# Altium PCB DIO_8SMA_8MCX_MEZZ.PcbDoc (part 1 of 4)
Units mm, origin at the board's own origin, x right, y up, seen from the top; angles counter-clockwise.
Board outline 143 x 98.9 mm, 4 copper layers (Top Layer, Layer 1, Layer 2, Bottom Layer), stack 1.57 mm thick; 303 components, 168 nets, 944 pads, 487 vias.
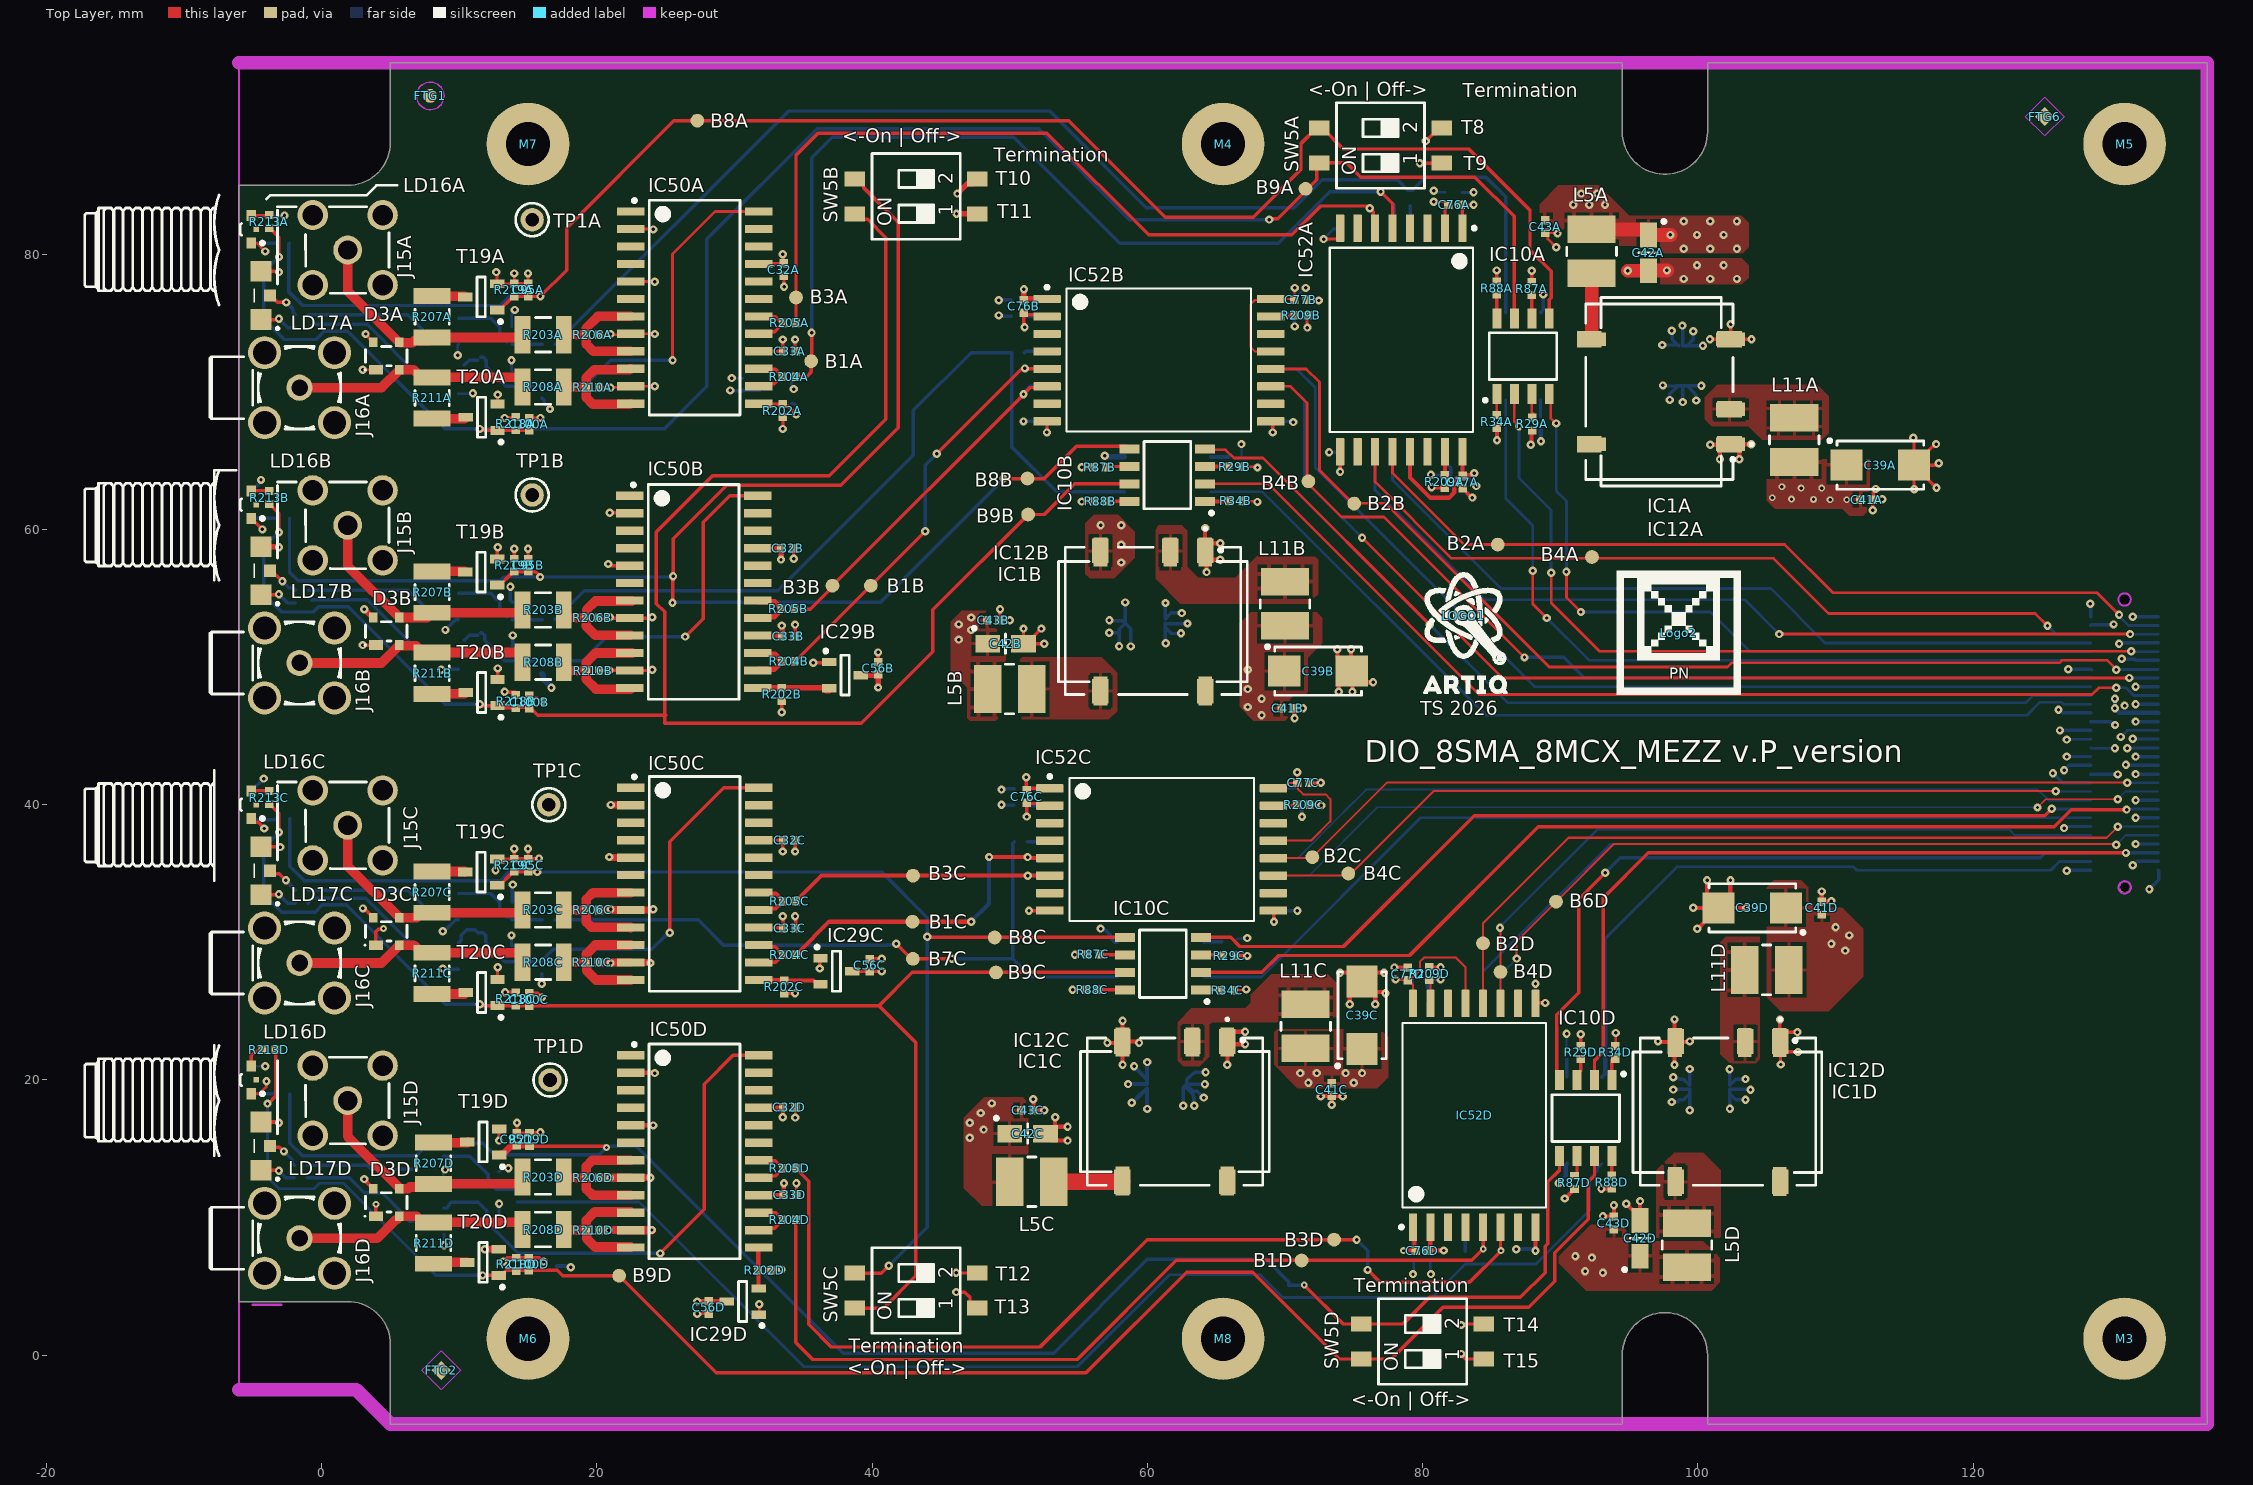
[diagram p0: Top Layer view]
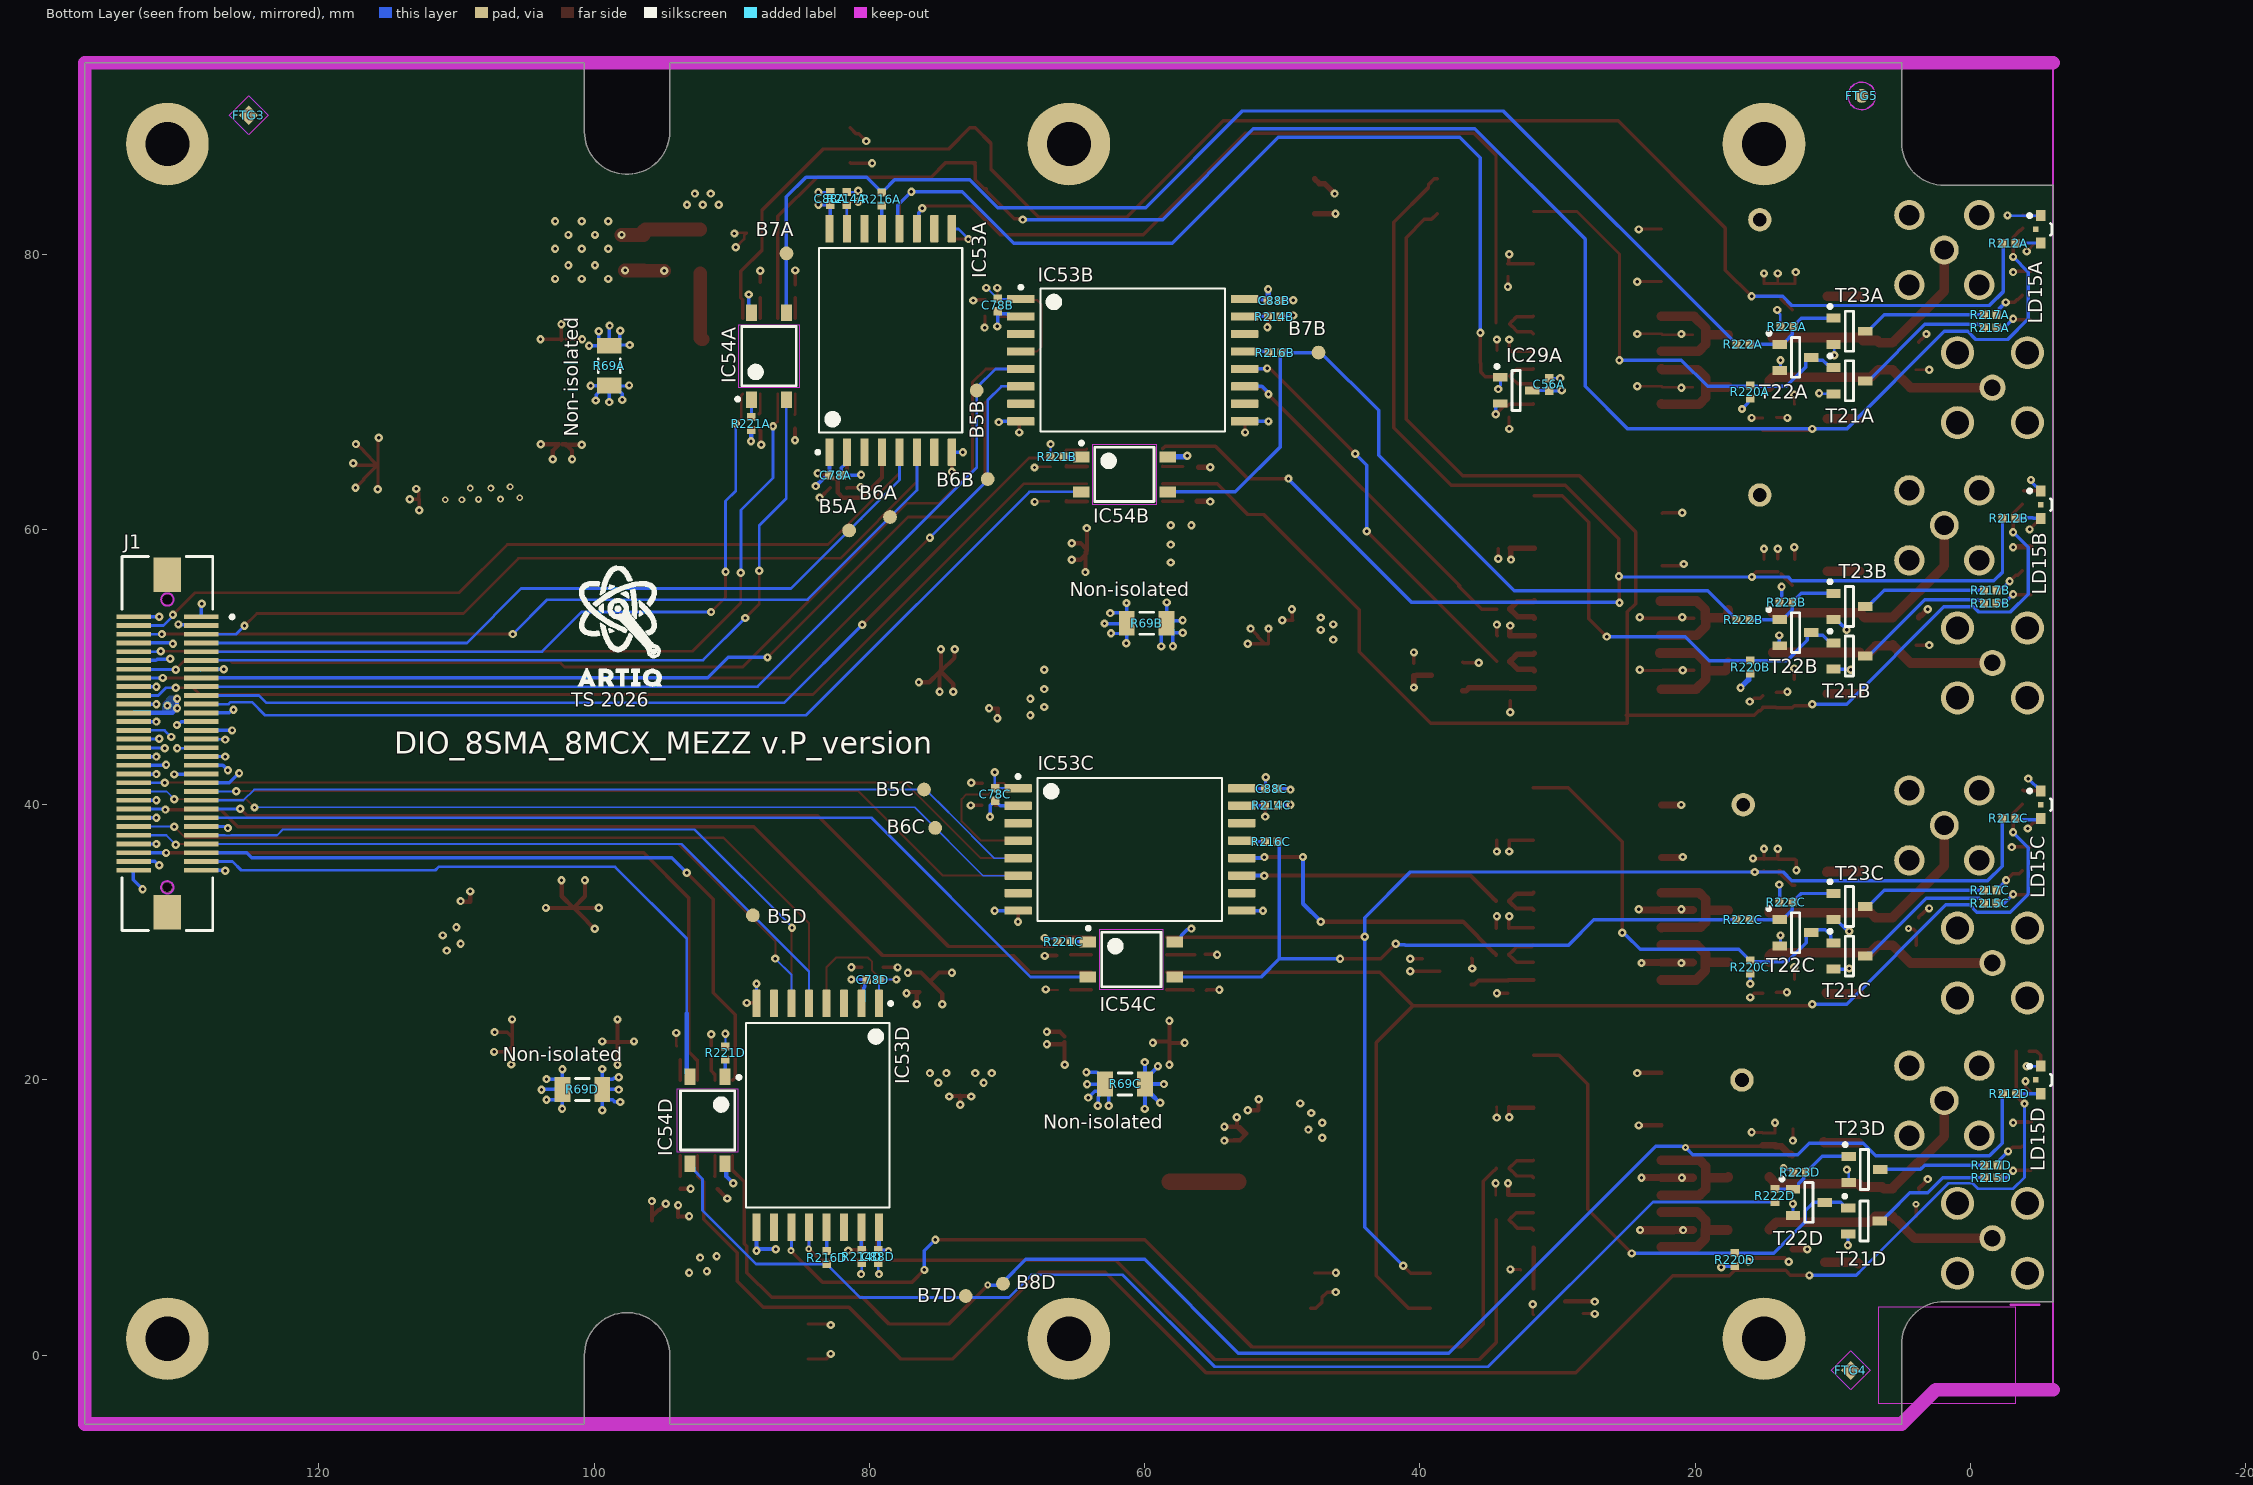
[diagram p1: Bottom Layer view, seen from below]
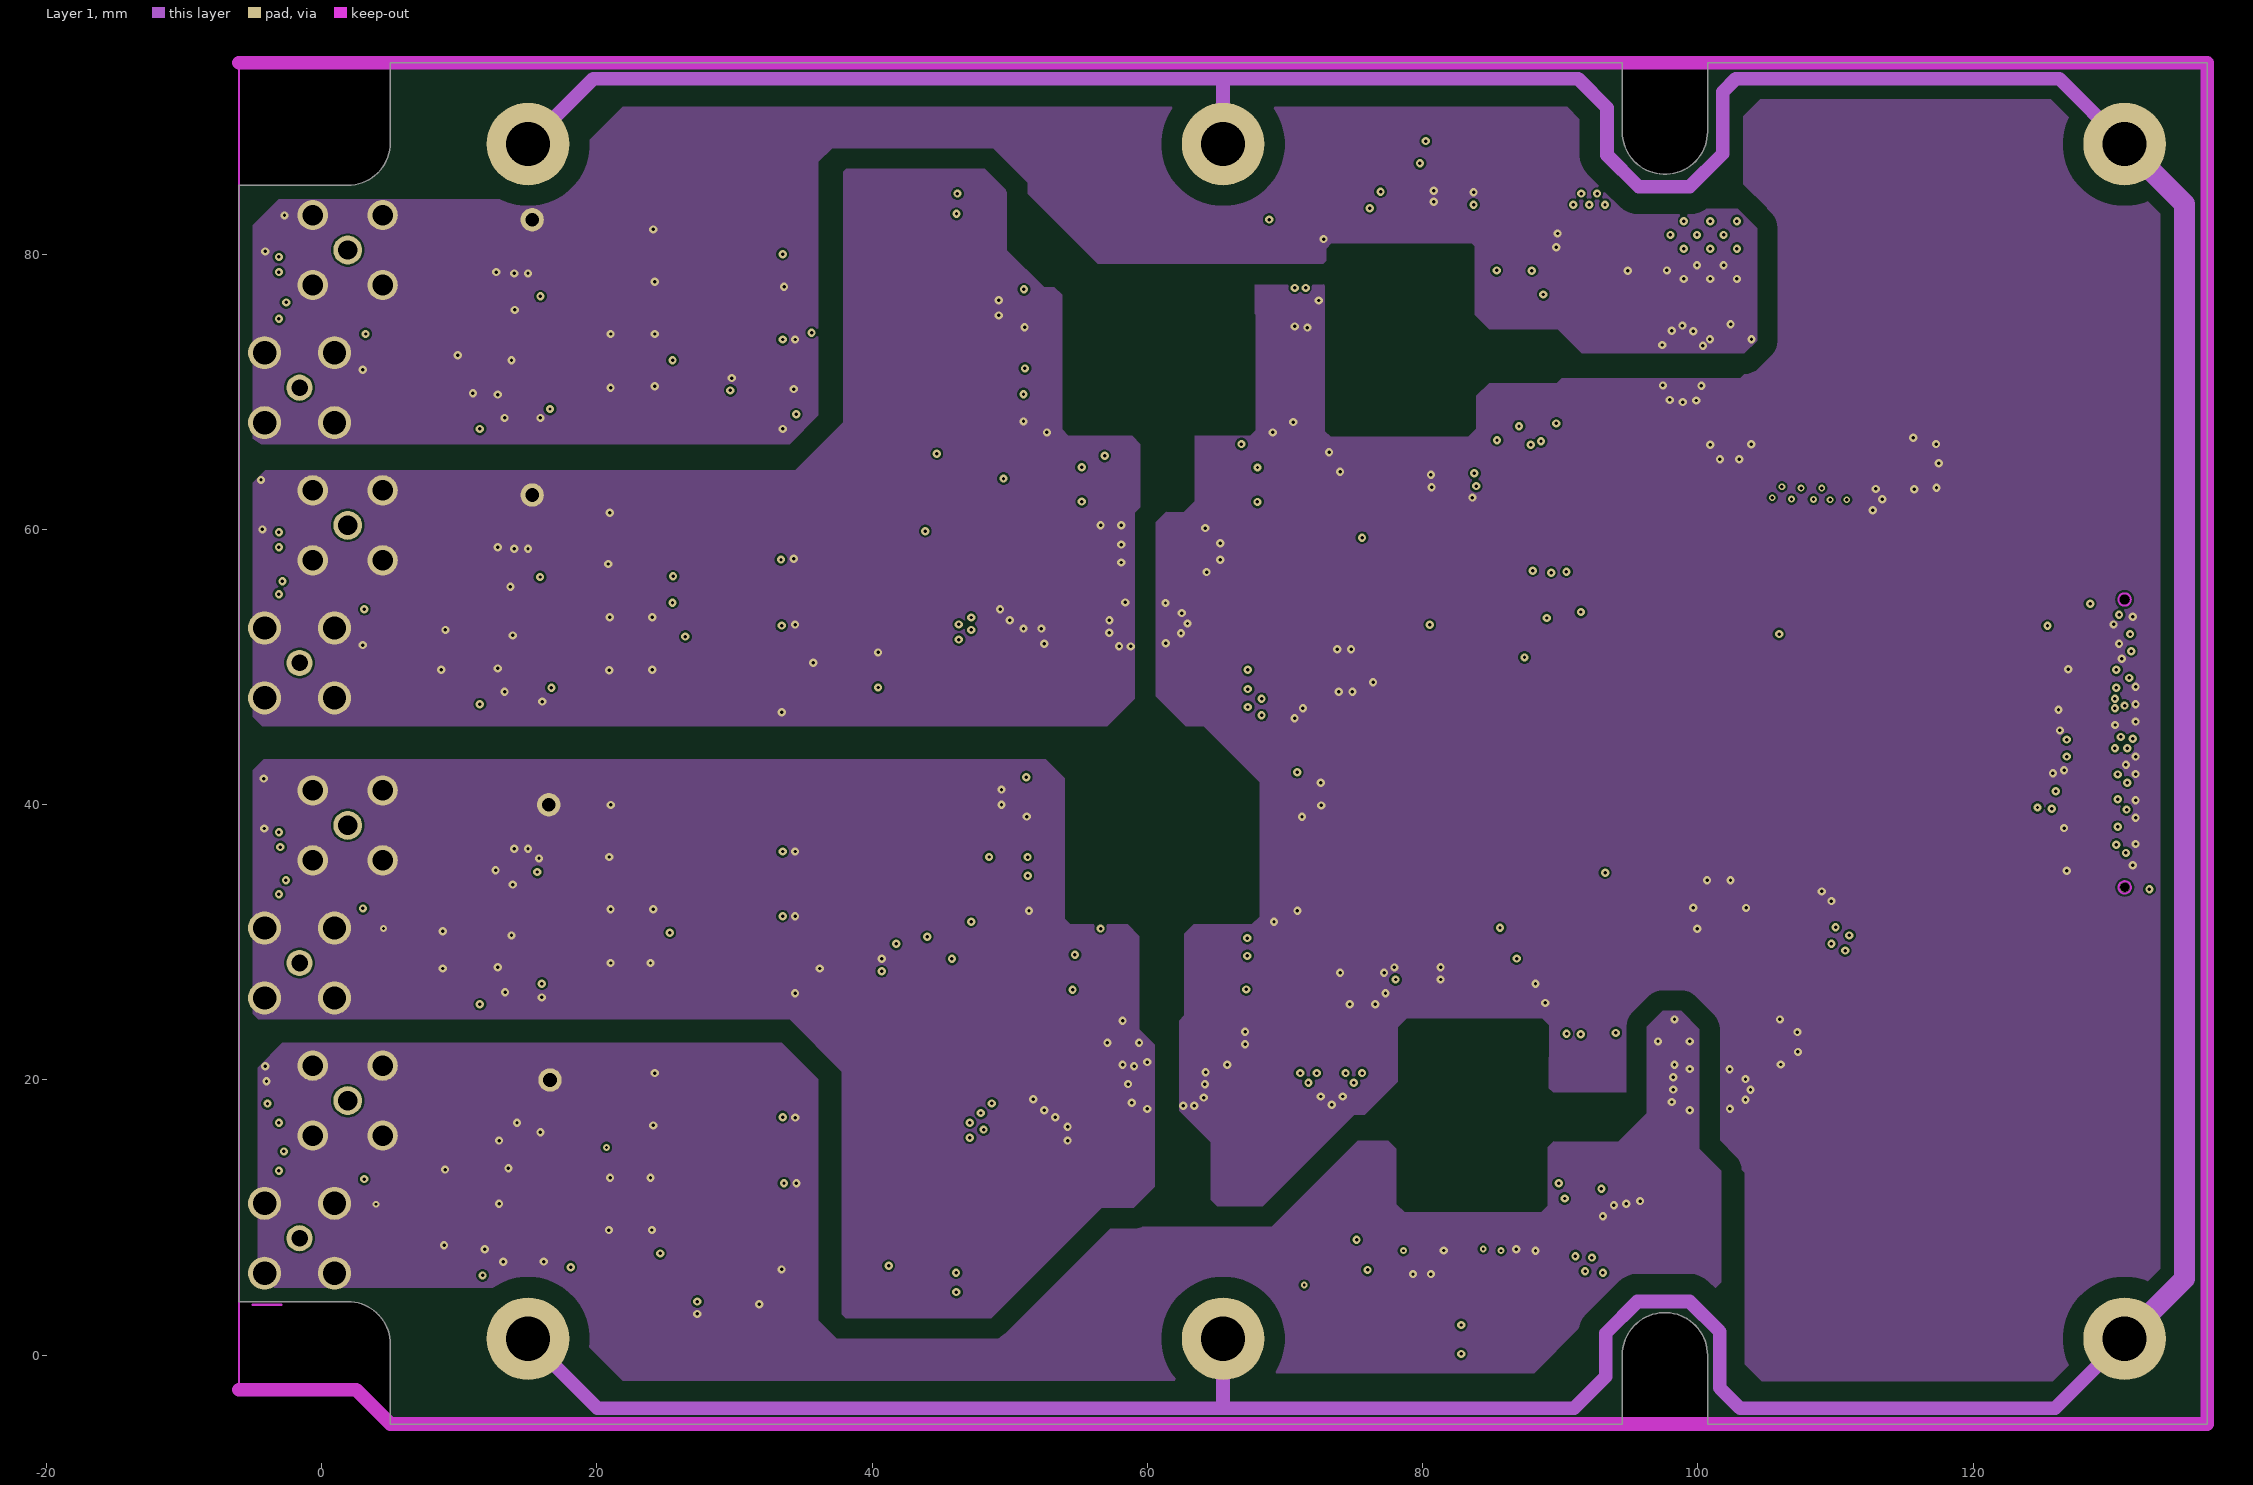
[diagram p2: Layer 1]
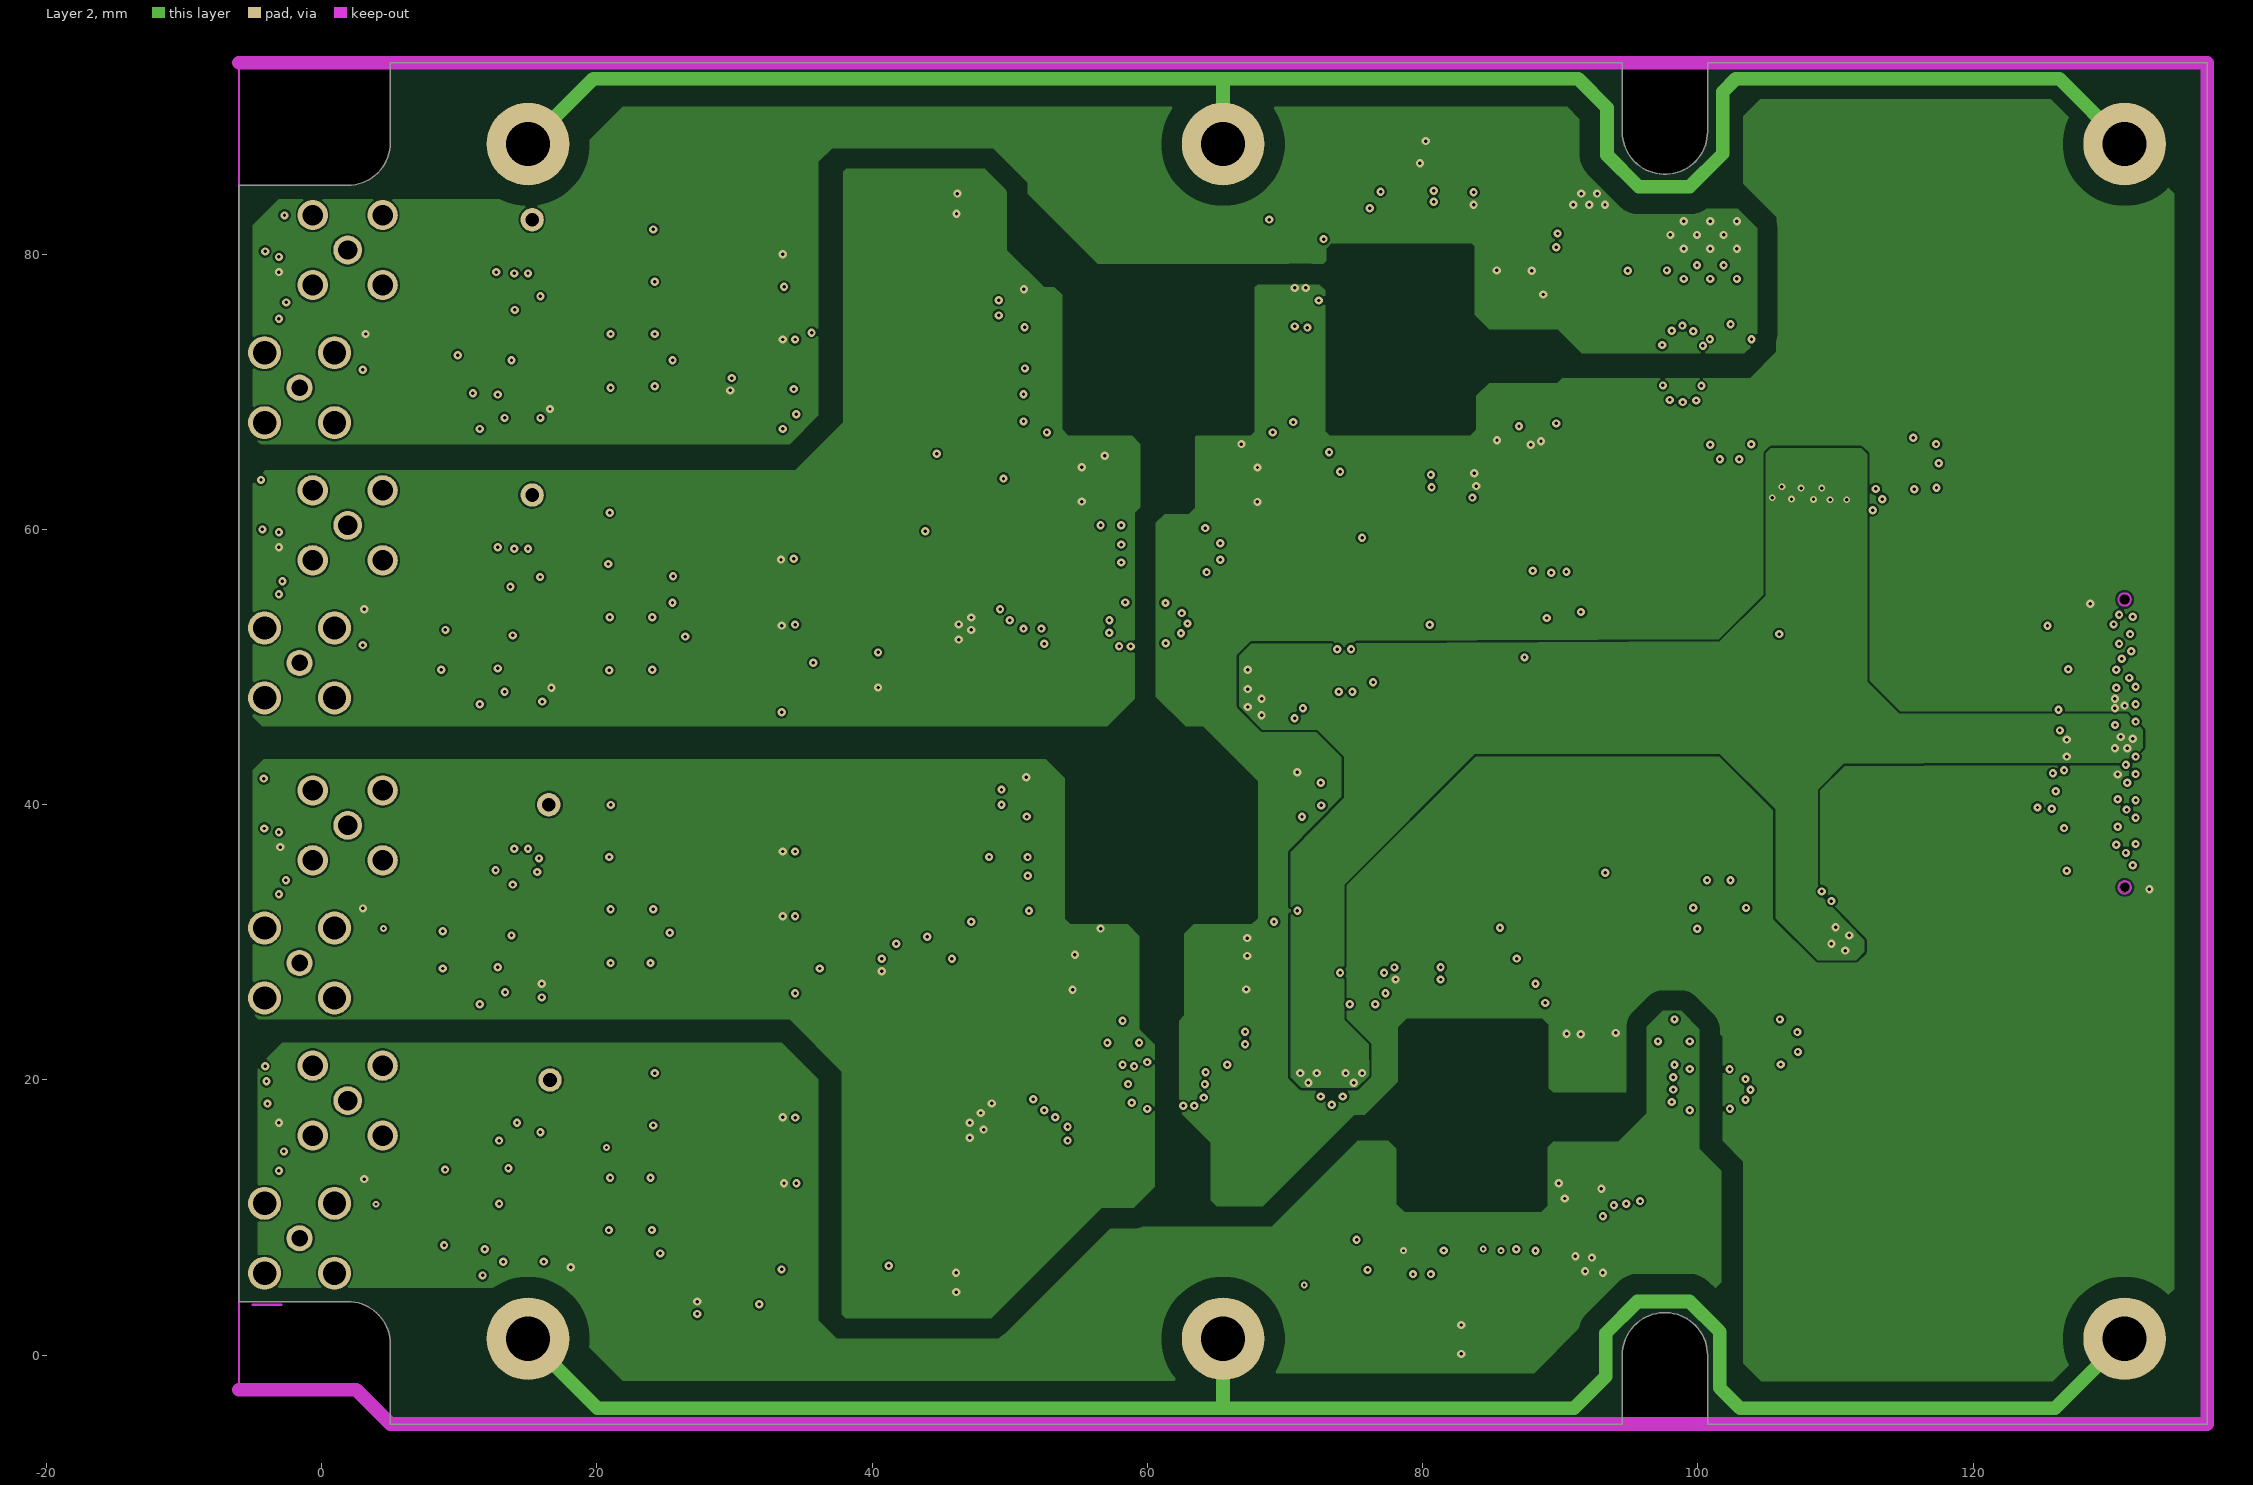
[diagram p3: Layer 2]
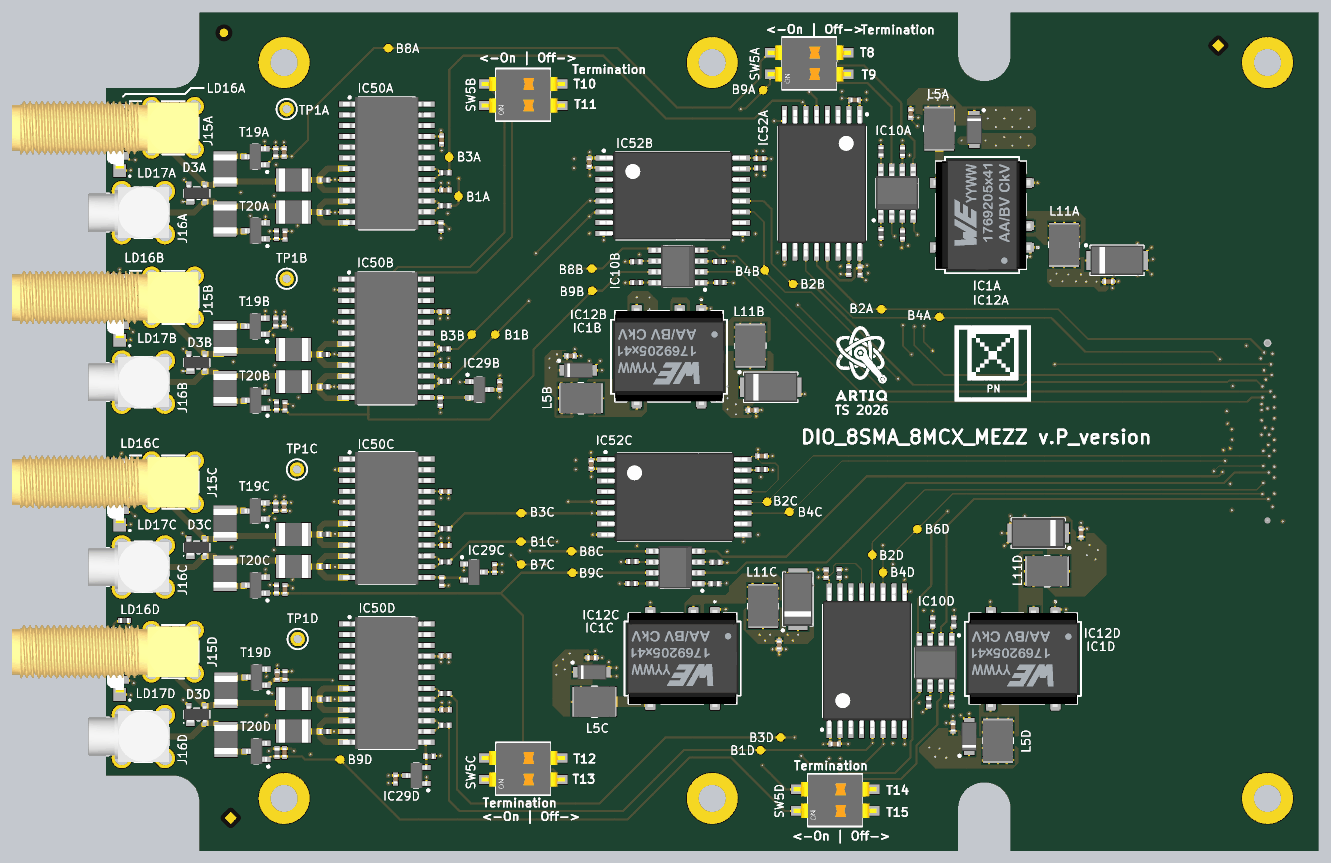
[diagram p6: 3D render of the assembled board from above, using the file's embedded part models]
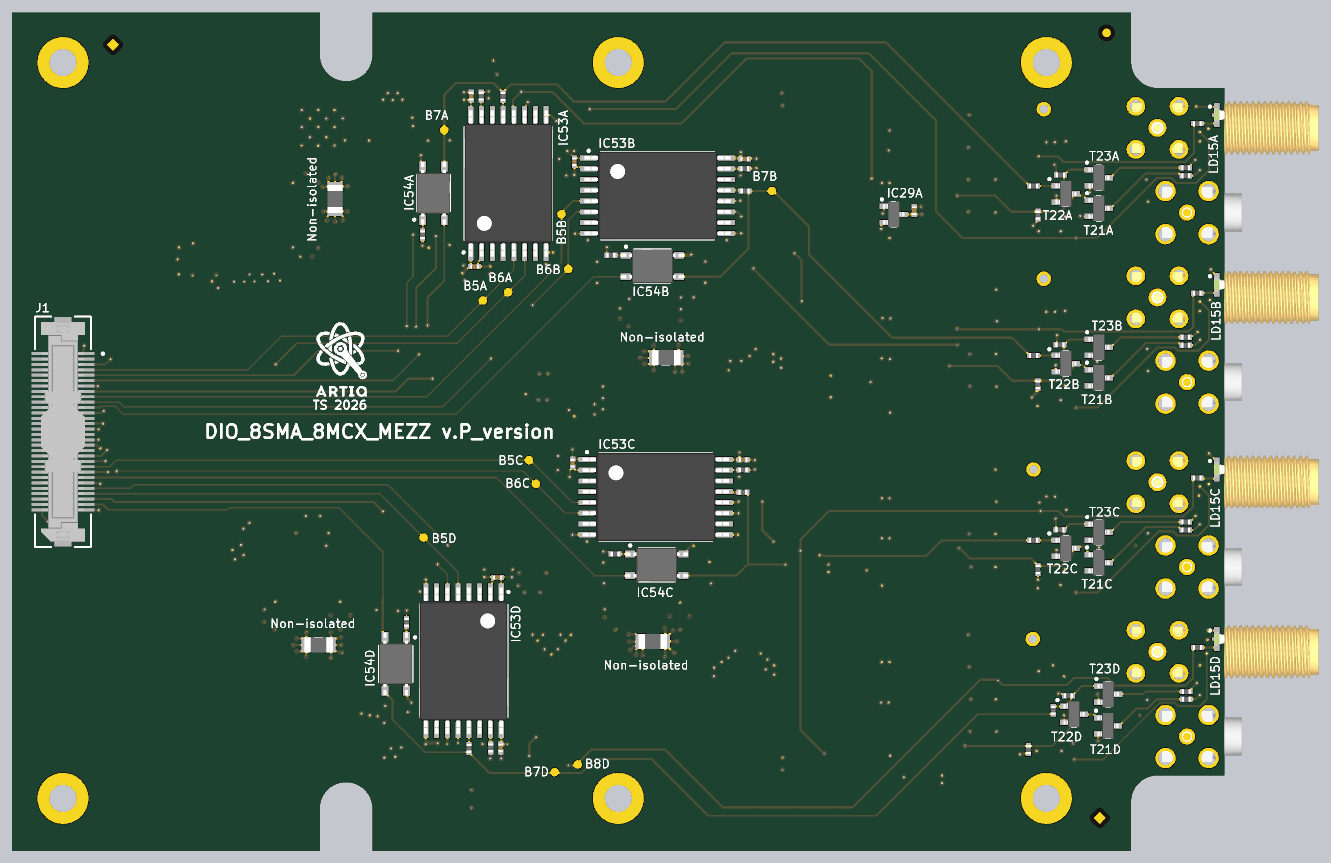
[diagram p7: 3D render of the assembled board from below, using the file's embedded part models]

## Layer stack, top to bottom
Top Solder: solder mask 0.01, Solder Resist, Dk 3.5
Top Layer: signal copper 0.035
Dielectric 2: prepreg 0.36, PP-006, Dk 4.1
Layer 1: signal copper 0.035
Dielectric 1: dielectric 0.71, FR-4, Dk 4.8
Layer 2: signal copper 0.035
Dielectric 3: prepreg 0.36, PP-006, Dk 4.1
Bottom Layer: signal copper 0.035
Bottom Solder: solder mask 0.01, Solder Resist, Dk 3.5

## Board outline
-6,3.9 1.9,3.9 cw(c1.9,0.8) 5,0.8 5,-5 94.5,-5 94.5,0 cw(c97.6,0) 100.7,0 100.7,-5 137,-5 137,93.9 100.7,93.9 100.7,88.9 cw(c97.6,88.9) 94.5,88.9 94.5,93.9 5,93.9 5,88.1 cw(c1.9,88.1) 1.9,85 -6,85

## Design rules (kind name [scope] priority, off if disabled: settings)
Clearance Clearance_screws [All vs InComponent('M*')] p1: gap=1.5 ignorepadtopadclearanceinfootprint=FALSE
Clearance Clearance_GND_ISO [InNetClass('GND_ISO') vs InNetClass('GND_ISO') or InNet('GND') or InNet('CHASSIS')] p2: gap=1.5 ignorepadtopadclearanceinfootprint=FALSE
Clearance Clearance_PWR_ISO [InNetClass('pwr_iso') vs InNetClass('PWR_ISO') or InNet('P3V3') or InNet('CHASSIS')] p3: gap=1.5 ignorepadtopadclearanceinfootprint=FALSE
Clearance Clearance_chassis [InNet('CHASSIS') vs NOT (IsKeepOut)] p4: gap=1 ignorepadtopadclearanceinfootprint=FALSE
Clearance [All] p5: gap=0.15 ignorepadtopadclearanceinfootprint=FALSE except(0: Arc-Hole Track-Hole SMDPad-Hole THPad-Hole Via-Hole Fill-Hole Poly-Hole Region-Hole Text-Hole)
ComponentClearance ComponentClearance_DCDC [InComponent('IC1*') vs InComponent('IC12*')] p1: gap=-1 collisioncheckmode=3 verticalgap=-1 showdistances=TRUE
ComponentClearance [All] p2: gap=0.254 collisioncheckmode=3 verticalgap=0.254 showdistances=FALSE
HoleSize [All] p1: absolutevalues=TRUE maxlimit=3.5 minlimit=0.025 maxpercent=80.000 minpercent=20.000
HoleToHoleClearance [All] p1: gap=0.15 allowstackedmicrovias=TRUE
MinimumSolderMaskSliver [All] p1: minsoldermaskwidth=0.015
PolygonConnect [All] p1: thpad.connectstyle=Direct thpad.reliefconductorwidth=0.254 thpad.reliefentries=4 thpad.polygonreliefangle="90 Angle" thpad.airgapwidth=0.254 smdpad.connectstyle=Relief smdpad.reliefconductorwidth=0.254 smdpad.reliefentries=4 smdpad.polygonreliefangle="90 Angle" smdpad.airgapwidth=0.254 via.connectstyle=Direct via.reliefconductorwidth=0.254 via.reliefentries=4 via.polygonreliefangle="90 Angle" via.airgapwidth=0.254
RoutingVias [All] p1: holewidth=0.3 width=0.6 viastyle="Through Hole" minholewidth=0.2 minwidth=0.5 maxholewidth=0.7 maxwidth=1
ShortCircuit ShortCircuit_Overlapp [InComponent('IC1A') or InComponent('IC1B') or InComponent('IC1C') or InComponent('IC1d') vs InComponent('IC12*')] p1: allowed=TRUE
ShortCircuit [All] p2: allowed=FALSE
SilkToSilkClearance [All] p1: silktosilkclearance=0.15
SilkToSolderMaskClearance [IsPad] p1: minsilkscreentomaskgap=0.1 clearancetoexposedcopper=TRUE
SolderMaskExpansion SolderMaskExpansion_Via [IsVia] p1: expansion=0.102 istentingtop=TRUE
SolderMaskExpansion [All] p2: expansion=0.102 istentingtop=FALSE
SupplyNets "Schematic Supply Nets_19" [InNet('P5V0_ISOB')] p1: voltage=0.000
SupplyNets "Schematic Supply Nets_18" [InNet('GND_ISOA')] p2: voltage=0.000
SupplyNets "Schematic Supply Nets_17" [InNet('P5V0_ISOA')] p3: voltage=0.000
SupplyNets "Schematic Supply Nets_16" [InNet('GND_ISOC')] p4: voltage=0.000
SupplyNets "Schematic Supply Nets_3" [InNet('GND_ISOD')] p5: voltage=0.000
SupplyNets "Schematic Supply Nets_2" [InNet('GND_ISOB')] p6: voltage=0.000
SupplyNets "Schematic Supply Nets_1" [InNet('P5V0_ISOD')] p7: voltage=0.000
SupplyNets "Schematic Supply Nets" [InNet('P5V0_ISOC')] p8: voltage=0.000
SupplyNets "Schematic Supply Nets_12" [InNet('CHASSIS')] p9: voltage=0.000
SupplyNets "Schematic Supply Nets_11" [InNet('P3V3')] p10: voltage=0.000
SupplyNets "Schematic Supply Nets_8" [InNet('GND')] p11: voltage=0.000
SupplyNets "Schematic Supply Nets_6" [InNet('P12V0')] p12: voltage=0.000
UnRoutedNet [Not InNet('CHASSIS')] p1: checkbadconnections=TRUE
ViasUnderSMD [All] p1: allowed=FALSE
Width Width_S50 [InNetClass('50Ohm')] p1: maxlimit=0.7 minlimit=0.254 preferedwidth=0.254 toplayer_minwidth=0.7 toplayer_prefwidth=0.7 impedanceprofiledriven=TRUE impedanceprofileid={798E204F-AD8F-4512-9349-E183A07B3C58} impedanceprofilevalue=50.000000 minimp=50.000000 maximp=50.000000 favimp=50.000000
Width [All] p2: maxlimit=2 minlimit=0.12 preferedwidth=0.3 minimp=50.000000 maximp=50.000000 favimp=50.000000
22 further rules are at their usual default settings.

## Classes and differential pairs
net class PWR_ISO: P5V0_ISOA P5V0_ISOB P5V0_ISOC P5V0_ISOD
component class Designator: J1
channel class Iso_SMA_MCX_Channel: Bank1 Bank2 Bank3 Bank4
channel class ISO_Single_Channel: Bank_5 Bank_6 Bank_7 Bank_8
channel class ISO_DC_12_DC_5: ISO_DCDC1 ISO_DCDC2 ISO_DCDC3 ISO_DCDC4
net class GND_ISO: GND_ISOA GND_ISOB GND_ISOC GND_ISOD
net class 50Ohm: IO0A IO0B IO0C IO0D IO1A IO1B IO1C IO1D NetIC50A_7 NetIC50A_10 NetIC50B_7 NetIC50B_10 NetIC50C_7 NetIC50C_10 NetIC50D_7 NetIC50D_10 NetR207A_1 NetR207B_1 NetR207C_1 NetR207D_1 NetR211A_1 NetR211B_1 NetR211C_1 NetR211D_1
component class ISO_DCDC4: C39D C41D C42D C43D IC1D IC12D L5D L11D R69D
component class ISO_DCDC3: C39C C41C C42C C43C IC1C IC12C L5C L11C R69C
component class ISO_DCDC2: C39B C41B C42B C43B IC1B IC12B L5B L11B R69B
component class ISO_DCDC1: C39A C41A C42A C43A IC1A IC12A L5A L11A R69A
component class Bank4: B1D B2D B3D B4D B5D B6D B7D B8D B9D C32D C33D C56D C76D C77D C78D C88D C95D C100D D3D IC10D IC29D IC50D IC52D IC53D IC54D J15_Bank4 J15D J16D LD15D LD16D LD17D R29D R34D R87D R88D R202D R203D R204D R205D R206D R207D R208D R209D R210D R211D R212D R213D R214D R215D R216D R217D R218D R219D R220D R221D R222D R223D SW5D T19D T20D T21D T22D T23D TP1D
component class Bank3: B1C B2C B3C B4C B5C B6C B7C B8C B9C C32C C33C C56C C76C C77C C78C C88C C95C C100C D3C IC10C IC29C IC50C IC52C IC53C IC54C J15_Bank3 J15C J16C LD15C LD16C LD17C R29C R34C R87C R88C R202C R203C R204C R205C R206C R207C R208C R209C R210C R211C R212C R213C R214C R215C R216C R217C R218C R219C R220C R221C R222C R223C SW5C T19C T20C T21C T22C T23C TP1C
component class Bank2: B1B B2B B3B B4B B5B B6B B7B B8B B9B C32B C33B C56B C76B C77B C78B C88B C95B C100B D3B IC10B IC29B IC50B IC52B IC53B IC54B J15_Bank2 J15B J16B LD15B LD16B LD17B R29B R34B R87B R88B R202B R203B R204B R205B R206B R207B R208B R209B R210B R211B R212B R213B R214B R215B R216B R217B R218B R219B R220B R221B R222B R223B SW5B T19B T20B T21B T22B T23B TP1B
component class Bank1: B1A B2A B3A B4A B5A B6A B7A B8A B9A C32A C33A C56A C76A C77A C78A C88A C95A C100A D3A IC10A IC29A IC50A IC52A IC53A IC54A J15_Bank1 J15A J16A LD15A LD16A LD17A R29A R34A R87A R88A R202A R203A R204A R205A R206A R207A R208A R209A R210A R211A R212A R213A R214A R215A R216A R217A R218A R219A R220A R221A R222A R223_Bank1 R223A SW5A T19A T20A T21A T22A T23A TP1A
component class U_Mechanical: FTG1 FTG2 FTG3 FTG4 FTG5 FTG6 LOGO1 Logo2 M3 M4 M5 M6 M7 M8

## Components (designator, comment, footprint, x,y, rotation, side; value= is the part's Value field where it differs from the comment)
B1A "SMD Pad" C100 35.574,72.223 r270 top (schematic designator B1)
B1B "SMD Pad" C100 39.904,55.917 r270 top (schematic designator B1)
B1C "SMD Pad" C100 42.932,31.5 r270 top (schematic designator B1)
B1D "SMD Pad" C100 71.205,6.889 r270 top (schematic designator B1)
B2A "SMD Pad" C100 85.456,58.9 r270 top (schematic designator B2)
B2B "SMD Pad" C100 75.028,61.877 r270 top (schematic designator B2)
B2C "SMD Pad" C100 71.988,36.188 r270 top (schematic designator B2)
B2D "SMD Pad" C100 84.385,29.93 r270 top (schematic designator B2)
B3A "SMD Pad" C100 34.47,76.849 r270 top (schematic designator B3)
B3B "SMD Pad" C100 37.119,55.917 r270 top (schematic designator B3)
B3C "SMD Pad" C100 42.973,34.845 r270 top (schematic designator B3)
B3D "SMD Pad" C100 73.566,8.4 r270 top (schematic designator B3)
B4A "SMD Pad" C100 92.3,58 r270 top (schematic designator B4)
B4B "SMD Pad" C100 71.7,63.5 r270 top (schematic designator B4)
B4C "SMD Pad" C100 74.6,35 r270 top (schematic designator B4)
B4D "SMD Pad" C100 85.655,27.851 r270 top (schematic designator B4)
B5A "SMD Pad" C100 81.471,59.929 r270 bottom (schematic designator B5)
B5B "SMD Pad" C100 72.2,70.1 r270 bottom (schematic designator B5)
B5C "SMD Pad" C100 76.026,41.1 r270 bottom (schematic designator B5)
B5D "SMD Pad" C100 88.464,31.964 r270 bottom (schematic designator B5)
B6A "SMD Pad" C100 78.497,60.903 r270 bottom (schematic designator B6)
B6B "SMD Pad" C100 71.4,63.659 r270 bottom (schematic designator B6)
B6C "SMD Pad" C100 75.216,38.316 r270 bottom (schematic designator B6)
B6D "SMD Pad" C100 89.694,32.958 r270 top (schematic designator B6)
B7A "SMD Pad" C100 86.024,80.056 r270 bottom (schematic designator B7)
B7B "SMD Pad" C100 47.369,72.85 r270 bottom (schematic designator B7)
B7C "SMD Pad" C100 42.961,28.8 r270 top (schematic designator B7)
B7D "SMD Pad" C100 73,4.3 r270 bottom (schematic designator B7)
B8A "SMD Pad" C100 27.3,89.7 r270 top (schematic designator B8)
B8B "SMD Pad" C100 51.286,63.699 r270 top (schematic designator B8)
B8C "SMD Pad" C100 48.906,30.355 r270 top (schematic designator B8)
B8D "SMD Pad" C100 70.287,5.201 r270 bottom (schematic designator B8)
B9A "SMD Pad" C100 71.493,84.752 r270 top (schematic designator B9)
B9B "SMD Pad" C100 51.334,61.084 r270 top (schematic designator B9)
B9C "SMD Pad" C100 49,27.815 r270 top (schematic designator B9)
B9D "SMD Pad" C100 21.623,5.777 r270 top (schematic designator B9)
C32A "100nF" CAPC1005X55N 33.572,78.88 r90 top (schematic designator C32)
C32B "100nF" CAPC1005X55N 33.856,58.628 r180 top (schematic designator C32)
C32C "100nF" CAPC1005X55N 34,37.414 r180 top (schematic designator C32)
C32D "100nF" CAPC1005X55N 33.979,18.035 r180 top (schematic designator C32)
C33A "100nF" CAPC1005X55N 34.001,72.954 r180 top (schematic designator C33)
C33B "100nF" CAPC1005X55N 33.923,52.247 r180 top (schematic designator C33)
C33C "100nF" CAPC1005X55N 34,31.029 r180 top (schematic designator C33)
C33D "100nF" CAPC1005X55N 34.033,11.65 r180 top (schematic designator C33)
C39A "1uF" CAPMP6032X280N 113.249,64.67 r0 top (schematic designator C39)
C39B "1uF" CAPMP6032X280N 72.4,49.7 r0 top (schematic designator C39)
C39C "1uF" CAPMP6032X280N 75.6,24.7 r90 top (schematic designator C39)
C39D "1uF" CAPMP6032X280N 103.95,32.5 r180 top (schematic designator C39)
C41A "100nF" CAPC1005X55N 112.249,62.17 r180 top (schematic designator C41)
C41B "100nF" CAPC1005X55N 70.2,47 r180 top (schematic designator C41)
C41C "100nF" CAPC1005X55N 73.4,19.3 r90 top (schematic designator C41)
C41D "100nF" CAPC1005X55N 109,32.5 r270 top (schematic designator C41)
C42A "4.7uF" CAPMP3216X180N 96.4,80.1 r270 top (schematic designator C42)
C42B "4.7uF" CAPMP3216X180N 49.7,51.7 r0 top (schematic designator C42)
C42C "4.7uF" CAPMP3216X180N 51.3,16.1 r0 top (schematic designator C42)
C42D "4.7uF" CAPMP3216X180N 95.8,8.5 r90 top (schematic designator C42)
C43A "100nF" CAPC1005X55N 88.9,82 r90 top (schematic designator C43)
C43B "100nF" CAPC1005X55N 48.8,53.4 r180 top (schematic designator C43)
C43C "100nF" CAPC1005X55N 51.3,17.8 r180 top (schematic designator C43)
C43D "100nF" CAPC1005X55N 93.9,9.6 r270 top (schematic designator C43)
C56A "100nF" CAPC1005X55N 30.591,70.541 r270 bottom (schematic designator C56)
C56B "100nF" CAPC1005X55N 40.431,49.915 r270 top (schematic designator C56)
C56C "100nF" CAPC1005X55N 39.827,28.338 r270 top (schematic designator C56)
C56D "100nF" CAPC1005X55N 28.148,3.478 r90 top (schematic designator C56)
C76A "100nF" CAPC1005X55N 82.309,83.585 r0 top (schematic designator C76)
C76B "100nF" CAPC1005X55N 51.001,76.203 r90 top (schematic designator C76)
C76C "100nF" CAPC1005X55N 51.234,40.586 r90 top (schematic designator C76)
C76D "100nF" CAPC1005X55N 79.955,7.611 r180 top (schematic designator C76)
C77A "100nF" CAPC1005X55N 82.919,63.433 r90 top (schematic designator C77)
C77B "100nF" CAPC1005X55N 71.127,76.675 r180 top (schematic designator C77)
C77C "100nF" CAPC1005X55N 71.327,41.585 r180 top (schematic designator C77)
C77D "100nF" CAPC1005X55N 78.933,27.699 r270 top (schematic designator C77)
C78A "100nF" CAPC1005X55N 82.45,63.933 r0 bottom (schematic designator C78)
C78B "100nF" CAPC1005X55N 70.667,76.3 r90 bottom (schematic designator C78)
C78C "100nF" CAPC1005X55N 70.867,40.75 r90 bottom (schematic designator C78)
C78D "100nF" CAPC1005X55N 79.75,27.267 r180 bottom (schematic designator C78)
C88A "100nF" CAPC1005X55N 82.85,84.033 r270 bottom (schematic designator C88)
C88B "100nF" CAPC1005X55N 50.588,76.623 r0 bottom (schematic designator C88)
C88C "100nF" CAPC1005X55N 50.767,41.15 r0 bottom (schematic designator C88)
C88D "100nF" CAPC1005X55N 79.35,7.167 r90 bottom (schematic designator C88)
C95A "100nF" CAPC1005X55N 15,77.4 r270 top (schematic designator C95)
C95B "100nF" CAPC1005X55N 15,57.4 r270 top (schematic designator C95)
C95C "100nF" CAPC1005X55N 15,35.6 r270 top (schematic designator C95)
C95D "100nF" CAPC1005X55N 14.187,15.692 r270 top (schematic designator C95)
C100A "100nF" CAPC1005X55N 15.093,67.646 r270 top (schematic designator C100)
C100B "100nF" CAPC1005X55N 15.094,47.461 r270 top (schematic designator C100)
C100C "100nF" CAPC1005X55N 15.093,25.846 r270 top (schematic designator C100)
C100D "100nF" CAPC1005X55N 15.046,6.614 r270 top (schematic designator C100)
D3A "D1213A-02SR-7" SOT190P238X100-4N 4.7,72.6 r90 top (schematic designator D3)
D3B "D1213A-02SR-7" SOT190P238X100-4N 4.7,52.6 r90 top (schematic designator D3)
D3C "D1213A-02SR-7" SOT190P238X100-4N 4.7,30.8 r90 top (schematic designator D3)
D3D "D1213A-02SR-7" SOT190P238X100-4N 4.7,11.1 r90 top (schematic designator D3)
FTG1 "Use only in PCB" FIDUCIAL_TOP_C100-200#1 7.9,91.5 r90 top
FTG2 "Use only in PCB" FIDUCIAL_TOP_S100-200 8.7,-1.1 r90 top
FTG3 "Use only in PCB" FIDUCIAL_TOP_S100-200 125.1,90.1 r90 bottom
FTG4 "Use only in PCB" FIDUCIAL_TOP_S100-200 8.7,-1.1 r90 bottom
FTG5 "Use only in PCB" FIDUCIAL_TOP_C100-200#2 7.9,91.5 r90 bottom
FTG6 "Use only in PCB" FIDUCIAL_TOP_S100-200 125.2,90 r90 top
IC1A "1769205241" WPME-FISM_SMT-8_L13.2W11.4H7.25 97.328,70.007 r90 top (schematic designator IC1)
IC1B "1769205241" WPME-FISM_SMT-8_L13.2W11.4H7.25 60.4,53.3 r180 top (schematic designator IC1)
IC1C "1769205241" WPME-FISM_SMT-8_L13.2W11.4H7.25 62,17.7 r180 top (schematic designator IC1)
IC1D "1769205241" WPME-FISM_SMT-8_L13.2W11.4H7.25 102.139,17.661 r180 top (schematic designator IC1)
IC10A "MOCD207M" SOIC127P594X363-8N 87.294,72.59 r90 top (schematic designator IC10)
IC10B "MOCD207M" SOIC127P594X363-8N 61.452,63.947 r180 top (schematic designator IC10)
IC10C "MOCD207M" SOIC127P594X363-8N 61.132,28.45 r180 top (schematic designator IC10)
IC10D "MOCD207M" SOIC127P594X363-8N 91.85,17.232 r270 top (schematic designator IC10)
IC12A "R1SE-1205/H2-R" R1SE-1205_H2-R 97.2,70 r90 top (schematic designator IC12)
IC12B "R1SE-1205/H2-R" R1SE-1205_H2-R 60.4,53.35 r180 top (schematic designator IC12)
IC12C "R1SE-1205/H2-R" R1SE-1205_H2-R 62,17.7 r180 top (schematic designator IC12)
IC12D "R1SE-1205/H2-R" R1SE-1205_H2-R 102.186,17.705 r180 top (schematic designator IC12)
IC29A "MCP810T-315I/TT" SOT95P237X112-3N 33,70.1 r180 bottom (schematic designator IC29)
IC29B "MCP810T-315I/TT" SOT95P237X112-3N 38.031,49.415 r0 top (schematic designator IC29)
IC29C "MCP810T-315I/TT" SOT95P237X112-3N 37.4,27.9 r0 top (schematic designator IC29)
IC29D "MCP810T-315I/TT" SOT95P237X112-3N 30.6,3.9 r180 top (schematic designator IC29)
IC50A "SN74ABTH25245DW" SOIC127P1030X265-24N 27.1,76.115 r0 top (schematic designator IC50)
IC50B "SN74ABTH25245DW" SOIC127P1030X265-24N 27.031,55.465 r0 top (schematic designator IC50)
IC50C "SN74ABTH25245DW" SOIC127P1030X265-24N 27.1,34.25 r0 top (schematic designator IC50)
IC50D "SN74ABTH25245DW" SOIC127P1030X265-24N 27.097,14.806 r0 top (schematic designator IC50)
IC52A "ISO7820DWW" SOIC127P1720X265-16N 78.45,73.767 r270 top (schematic designator IC52)
IC52B "ISO7820DWW" SOIC127P1720X265-16N 60.833,72.3 r0 top (schematic designator IC52)
IC52C "ISO7820DWW" SOIC127P1720X265-16N 61.033,36.75 r0 top (schematic designator IC52)
IC52D "ISO7820DWW" SOIC127P1720X265-16N 83.75,17.433 r90 top (schematic designator IC52)
IC53A "ISO7820DWW" SOIC127P1720X265-16N 78.45,73.733 r90 bottom (schematic designator IC53)
IC53B "ISO7820DWW" SOIC127P1720X265-16N 60.867,72.3 r180 bottom (schematic designator IC53)
IC53C "ISO7820DWW" SOIC127P1720X265-16N 61.067,36.75 r180 bottom (schematic designator IC53)
IC53D "ISO7820DWW" SOIC127P1720X265-16N 83.75,17.433 r270 bottom (schematic designator IC53)
IC54A "TLP183" TOSHIBA_11-4M1S 87.294,72.59 r90 bottom (schematic designator IC54)
IC54B "TLP183" TOSHIBA_11-4M1S 61.467,64 r180 bottom (schematic designator IC54)
IC54C "TLP183" TOSHIBA_11-4M1S 60.967,28.75 r180 bottom (schematic designator IC54)
IC54D "TLP183" TOSHIBA_11-4M1S 91.75,17.067 r270 bottom (schematic designator IC54)
J1 "55091-0674" 55091-0674 131,44.45 r270 bottom locked
J15A "Delock_65848" Delock_65848 1.9,80.3 r0 top locked (schematic designator J15)
J15B "Delock_65848" Delock_65848 1.9,60.3 r0 top (schematic designator J15)
J15C "Delock_65848" Delock_65848 1.9,38.5 r0 top locked (schematic designator J15)
J15D "Delock_65848" Delock_65848 1.9,18.5 r0 top locked (schematic designator J15)
J16A "MCX" AMPHENOL_919-383J-51A -1.6,70.3 r180 top locked (schematic designator J16)
J16B "MCX" AMPHENOL_919-383J-51A -1.6,50.3 r180 top locked (schematic designator J16)
J16C "MCX" AMPHENOL_919-383J-51A -1.6,28.5 r180 top locked (schematic designator J16)
J16D "MCX" AMPHENOL_919-383J-51A -1.6,8.5 r180 top locked (schematic designator J16)
L5A "10uH" IND_MURATA-PS_8400 92.278,80.2 r270 top (schematic designator L5)
L5B "10uH" IND_MURATA-PS_8400 50,48.4 r0 top (schematic designator L5)
L5C "10uH" IND_MURATA-PS_8400 51.6,12.6 r0 top (schematic designator L5)
L5D "10uH" IND_MURATA-PS_8400 99.2,8 r90 top (schematic designator L5)
L11A "10uH" IND_MURATA-PS_8400 107,66.5 r270 top (schematic designator L11)
L11B "10uH" IND_MURATA-PS_8400 70,54.6 r270 top (schematic designator L11)
L11C "10uH" IND_MURATA-PS_8400 71.5,23.9 r270 top (schematic designator L11)
L11D "10uH" IND_MURATA-PS_8400 105,28 r0 top (schematic designator L11)
LD15A "Green" LED_AVAGO_HSME-C120#1 -5.1,81.8 r270 bottom locked (schematic designator LD15)
LD15B "Green" LED_AVAGO_HSME-C120#2 -5.1,61.8 r270 bottom locked (schematic designator LD15)
LD15C "Green" LED_AVAGO_HSME-C120#2 -5.1,40 r270 bottom locked (schematic designator LD15)
LD15D "Green" LED_AVAGO_HSME-C120#1 -5.1,20 r270 bottom locked (schematic designator LD15)
LD16A "Green" LED_AVAGO_HSME-C120#1 -5.1,81.8 r90 top locked (schematic designator LD16)
LD16B "Green" LED_AVAGO_HSME-C120#1 -5.1,61.8 r90 top locked (schematic designator LD16)
LD16C "Green" LED_AVAGO_HSME-C120#1 -5.1,40 r90 top locked (schematic designator LD16)
LD16D "Green" LED_AVAGO_HSME-C120#1 -5.1,20 r90 top locked (schematic designator LD16)
LD17A "APBA3010SURKSGC-F01" APBA3010SURKSGC-F01 -4.4,77 r90 top locked (schematic designator LD17)
LD17B "APBA3010SURKSGC-F01" APBA3010SURKSGC-F01 -4.4,57 r90 top locked (schematic designator LD17)
LD17C "APBA3010SURKSGC-F01" APBA3010SURKSGC-F01 -4.4,35.2 r90 top locked (schematic designator LD17)
LD17D "APBA3010SURKSGC-F01" APBA3010SURKSGC-F01 -4.4,15.2 r90 top locked (schematic designator LD17)
LOGO1 "ARTIQ_LOGO" ARTIQ_Logo 82.971,53.729 r0 top
Logo2 "QR_descr" QR_descr 98.6,52.5 r0 top
M3 "PTH_M3.2x6" PTH_3,2x6 131,1.2 r0 top locked
M4 "PTH_M3.2x6" PTH_3,2x6 65.5,88 r0 top locked
M5 "PTH_M3.2x6" PTH_3,2x6 131,88 r0 top locked
M6 "PTH_M3.2x6" PTH_3,2x6 15,1.2 r0 top locked
M7 "PTH_M3.2x6" PTH_3,2x6 15,88 r0 top locked
M8 "PTH_M3.2x6" PTH_3,2x6 65.5,1.2 r0 top locked
R29A "510" RESC1005X40N 87.949,67.67 r270 top (schematic designator R29)
R29B "510" RESC1005X40N 66.351,64.542 r0 top (schematic designator R29)
R29C "510" RESC1005X40N 65.95,29.043 r0 top (schematic designator R29)
R29D "510" RESC1005X40N 91.5,22 r90 top (schematic designator R29)
R34A "510" RESC1005X40N 85.398,67.833 r270 top (schematic designator R34)
R34B "510" RESC1005X40N 66.438,62.067 r0 top (schematic designator R34)
R34C "510" RESC1005X40N 65.812,26.52 r0 top (schematic designator R34)
R34D "510" RESC1005X40N 94,22 r90 top (schematic designator R34)
R69A "0" RESC3216X65N 98.9,71.9 r90 bottom (schematic designator R69)
R69B "0" RESC3216X65N 59.849,53.191 r180 bottom (schematic designator R69)
R69C "0" RESC3216X65N 61.425,19.713 r180 bottom (schematic designator R69)
R69D "0" RESC3216X65N 100.851,19.315 r180 bottom (schematic designator R69)
R87A "100" RESC1005X40N 87.938,77.495 r270 top (schematic designator R87)
R87B "100" RESC1005X40N 56.531,64.509 r0 top (schematic designator R87)
R87C "100" RESC1005X40N 56.058,29.141 r0 top (schematic designator R87)
R87D "100" RESC1005X40N 91.032,12.548 r90 top (schematic designator R87)
R88A "100" RESC1005X40N 85.398,77.532 r270 top (schematic designator R88)
R88B "100" RESC1005X40N 56.563,62.046 r0 top (schematic designator R88)
R88C "100" RESC1005X40N 55.996,26.539 r0 top (schematic designator R88)
R88D "100" RESC1005X40N 93.742,12.58 r90 top (schematic designator R88)
R202A "Undefined" RESC1005X40N 33.496,68.64 r90 top (schematic designator R202)
R202B "Undefined" RESC1005X40N 33.427,48.008 r90 top (schematic designator R202)
R202C "Undefined" RESC1005X40N 33.6,26.77 r90 top (schematic designator R202)
R202D "Undefined" RESC1005X40N 32.161,6.16 r180 top (schematic designator R202)
R203A "30R" RESC3225X70N 16.1,74.15 r0 top (schematic designator R203)
R203B "30R" RESC3225X70N 16.1,54.15 r0 top (schematic designator R203)
R203C "30R" RESC3225X70N 16.1,32.35 r0 top (schematic designator R203)
R203D "30R" RESC3225X70N 16.1,12.95 r0 top (schematic designator R203)
R204A "22" RESC1005X40N 33.968,71.107 r0 top (schematic designator R204)
R204B "22" RESC1005X40N 33.931,50.415 r0 top (schematic designator R204)
R204C "22" RESC1005X40N 34,29.1 r0 top (schematic designator R204)
R204D "22" RESC1005X40N 33.985,9.834 r0 top (schematic designator R204)
R205A "22" RESC1005X40N 34,75 r0 top (schematic designator R205)
R205B "22" RESC1005X40N 33.903,54.222 r0 top (schematic designator R205)
R205C "22" RESC1005X40N 34,33 r0 top (schematic designator R205)
R205D "22" RESC1005X40N 33.982,13.583 r0 top (schematic designator R205)
R206A "10k" RESC1005X40N 19.7,74.145 r180 top (schematic designator R206)
R206B "10k" RESC1005X40N 19.664,53.571 r180 top (schematic designator R206)
R206C "10k" RESC1005X40N 19.7,32.35 r180 top (schematic designator R206)
R206D "10k" RESC1005X40N 19.7,12.9 r180 top (schematic designator R206)
R207A "49R9" RESC3225X70N 8.033,75.45 r270 top (schematic designator R207)
R207B "49R9" RESC3225X70N 8.033,55.45 r270 top (schematic designator R207)
R207C "49R9" RESC3225X70N 8.033,33.65 r270 top (schematic designator R207)
R207D "49R9" RESC3225X70N 8.133,13.95 r270 top (schematic designator R207)
R208A "30R" RESC3225X70N 16.1,70.35 r0 top (schematic designator R208)
R208B "30R" RESC3225X70N 16.1,50.35 r0 top (schematic designator R208)
R208C "30R" RESC3225X70N 16.1,28.55 r0 top (schematic designator R208)
R208D "30R" RESC3225X70N 16.1,9.133 r0 top (schematic designator R208)
R209A "0" RESC1005X40N 81.605,63.475 r270 top (schematic designator R209)
R209B "0" RESC1005X40N 71.156,75.558 r0 top (schematic designator R209)
R209C "0" RESC1005X40N 71.343,39.988 r0 top (schematic designator R209)
R209D "0" RESC1005X40N 80.471,27.727 r90 top (schematic designator R209)
R210A "10k" RESC1005X40N 19.7,70.335 r180 top (schematic designator R210)
R210B "10k" RESC1005X40N 19.7,49.75 r180 top (schematic designator R210)
R210C "10k" RESC1005X40N 19.664,28.55 r180 top (schematic designator R210)
R210D "10k" RESC1005X40N 19.7,9.099 r180 top (schematic designator R210)
R211A "49R9" RESC3225X70N 8.033,69.55 r90 top (schematic designator R211)
R211B "49R9" RESC3225X70N 8.033,49.55 r90 top (schematic designator R211)
R211C "49R9" RESC3225X70N 8.033,27.75 r90 top (schematic designator R211)
R211D "49R9" RESC3225X70N 8.133,8.15 r90 top (schematic designator R211)
R212A "510" RESC1005X40N -2.8,80.8 r180 bottom (schematic designator R212)
R212B "510" RESC1005X40N -2.8,60.8 r180 bottom (schematic designator R212)
R212C "510" RESC1005X40N -2.8,39 r180 bottom (schematic designator R212)
R212D "510" RESC1005X40N -2.83,19 r180 bottom (schematic designator R212)
R213A "510" RESC1005X40N -3.806,82.359 r90 top (schematic designator R213)
R213B "510" RESC1005X40N -3.796,62.307 r90 top (schematic designator R213)
R213C "510" RESC1005X40N -3.791,40.518 r90 top (schematic designator R213)
R213D "510" RESC1005X40N -3.834,22.18 r180 top (schematic designator R213)
R214A "0" RESC1005X40N 81.65,84.033 r270 bottom (schematic designator R214)
R214B "0" RESC1005X40N 50.58,75.464 r0 bottom (schematic designator R214)
R214C "0" RESC1005X40N 50.767,39.95 r0 bottom (schematic designator R214)
R214D "0" RESC1005X40N 80.55,7.167 r90 bottom (schematic designator R214)
R215A "510" RESC1005X40N -1.439,74.654 r180 bottom (schematic designator R215)
R215B "510" RESC1005X40N -1.439,54.654 r180 bottom (schematic designator R215)
R215C "510" RESC1005X40N -1.439,32.854 r180 bottom (schematic designator R215)
R215D "510" RESC1005X40N -1.5,12.9 r180 bottom (schematic designator R215)
R216A "100" RESC1005X40N 79.1,84 r270 bottom (schematic designator R216)
R216B "100" RESC1005X40N 50.533,72.849 r0 bottom (schematic designator R216)
R216C "100" RESC1005X40N 50.8,37.3 r0 bottom (schematic designator R216)
R216D "100" RESC1005X40N 83.1,7.1 r90 bottom (schematic designator R216)
R217A "510" RESC1005X40N -1.439,75.595 r180 bottom (schematic designator R217)
R217B "510" RESC1005X40N -1.439,55.595 r180 bottom (schematic designator R217)
R217C "510" RESC1005X40N -1.439,33.795 r180 bottom (schematic designator R217)
R217D "510" RESC1005X40N -1.5,13.8 r180 bottom (schematic designator R217)
R218A "10k" RESC1005X40N 14.099,67.684 r90 top (schematic designator R218)
R218B "10k" RESC1005X40N 14.1,47.5 r90 top (schematic designator R218)
R218C "10k" RESC1005X40N 14.099,25.884 r90 top (schematic designator R218)
R218D "10k" RESC1005X40N 14.15,6.603 r90 top (schematic designator R218)
R219A "10k" RESC1005X40N 14,77.4 r90 top (schematic designator R219)
R219B "10k" RESC1005X40N 14,57.4 r90 top (schematic designator R219)
R219C "10k" RESC1005X40N 14,35.6 r90 top (schematic designator R219)
R219D "10k" RESC1005X40N 15.107,15.691 r90 top (schematic designator R219)
R220A "10k" RESC1005X40N 16,70 r270 bottom (schematic designator R220)
R220B "10k" RESC1005X40N 16,50 r270 bottom (schematic designator R220)
R220C "10k" RESC1005X40N 16,28.2 r270 bottom (schematic designator R220)
R220D "10k" RESC1005X40N 17.11,6.95 r270 bottom (schematic designator R220)
R221A "510" RESC1005X40N 88.578,67.687 r270 bottom (schematic designator R221)
R221B "510" RESC1005X40N 66.371,65.283 r0 bottom (schematic designator R221)
R221C "510" RESC1005X40N 65.871,30.033 r0 bottom (schematic designator R221)
R221D "510" RESC1005X40N 90.466,21.971 r90 bottom (schematic designator R221)
R222A "22" RESC1005X40N 16.513,73.444 r0 bottom (schematic designator R222)
R222B "22" RESC1005X40N 16.513,53.444 r0 bottom (schematic designator R222)
R222C "22" RESC1005X40N 16.513,31.644 r0 bottom (schematic designator R222)
R222D "22" RESC1005X40N 14.2,11.6 r270 bottom (schematic designator R222)
R223A "10k" RESC1005X40N 13.324,74.735 r180 bottom (schematic designator R223)
R223B "10k" RESC1005X40N 13.4,54.7 r180 bottom (schematic designator R223)
R223C "10k" RESC1005X40N 13.4,32.9 r180 bottom (schematic designator R223)
R223D "10k" RESC1005X40N 12.4,13.3 r180 bottom (schematic designator R223)
SW5A "Switch" SW_OMRON_A6S-2102-H 76.943,87.9 r180 top (schematic designator SW5)
SW5B "Switch" SW_OMRON_A6S-2102-H 43.2,84.2 r180 top locked (schematic designator SW5)
SW5C "Switch" SW_OMRON_A6S-2102-H 43.2,4.7 r180 top (schematic designator SW5)
SW5D "Switch" SW_OMRON_A6S-2102-H 80,1 r180 top (schematic designator SW5)
T19A "BSS138LT1G" SOT95P240X110-3N 11.6,76.9 r180 top (schematic designator T19)
T19B "BSS138LT1G" SOT95P240X110-3N 11.6,56.9 r180 top (schematic designator T19)
T19C "BSS138LT1G" SOT95P240X110-3N 11.6,35.1 r180 top (schematic designator T19)
T19D "BSS138LT1G" SOT95P240X110-3N 11.744,15.5 r180 top (schematic designator T19)
T20A "BSS138LT1G" SOT95P240X110-3N 11.633,68.15 r180 top (schematic designator T20)
T20B "BSS138LT1G" SOT95P240X110-3N 11.633,48.15 r180 top (schematic designator T20)
T20C "BSS138LT1G" SOT95P240X110-3N 11.633,26.35 r180 top (schematic designator T20)
T20D "BSS138LT1G" SOT95P240X110-3N 11.733,6.75 r180 top (schematic designator T20)
T21A "BSS138LT1G" SOT95P240X110-3N 8.8,70.8 r180 bottom (schematic designator T21)
T21B "BSS138LT1G" SOT95P240X110-3N 8.8,50.8 r180 bottom (schematic designator T21)
T21C "BSS138LT1G" SOT95P240X110-3N 8.8,29 r180 bottom (schematic designator T21)
T21D "BSS138LT1G" SOT95P240X110-3N 7.733,9.75 r180 bottom (schematic designator T21)
T22A "BSS138LT1G" SOT95P240X110-3N 12.7,72.5 r180 bottom (schematic designator T22)
T22B "BSS138LT1G" SOT95P240X110-3N 12.7,52.5 r180 bottom (schematic designator T22)
T22C "BSS138LT1G" SOT95P240X110-3N 12.7,30.7 r180 bottom (schematic designator T22)
T22D "BSS138LT1G" SOT95P240X110-3N 11.742,11.11 r180 bottom (schematic designator T22)
T23A "BSS138LT1G" SOT95P240X110-3N 8.8,74.4 r180 bottom (schematic designator T23)
T23B "BSS138LT1G" SOT95P240X110-3N 8.8,54.4 r180 bottom (schematic designator T23)
T23C "BSS138LT1G" SOT95P240X110-3N 8.8,32.6 r180 bottom (schematic designator T23)
T23D "BSS138LT1G" SOT95P240X110-3N 7.7,13.5 r180 bottom (schematic designator T23)
TP1A "Plated Hole" c150h100 15.3,82.506 r270 top (schematic designator TP1)
TP1B "Plated Hole" c150h100 15.3,62.5 r270 top (schematic designator TP1)
TP1C "Plated Hole" c150h100 16.513,40 r270 top (schematic designator TP1)
TP1D "Plated Hole" c150h100 16.6,20 r270 top (schematic designator TP1)

## Footprints (in the part's own frame and the unit in brackets; to place one, negate y for a bottom-side part, rotate by r counter-clockwise, add the part's x,y. Pads: shape width x height; smd on the part's side, far side on the other; paste and mask are expansions set on the pad)
55091-0674 [mm]
  rect 0.35x2.5 smd paste+0 mask+0: 1(-9.207,2.45) 2(-9.207,-2.45) 3(-8.572,2.45) 4(-8.572,-2.45) 5(-7.938,2.45) 6(-7.938,-2.45) 7(-7.302,2.45) 8(-7.302,-2.45) 9(-6.667,2.45) 10(-6.667,-2.45) 11(-6.032,2.45) 12(-6.033,-2.45) 13(-5.397,2.45) 14(-5.398,-2.45) 15(-4.762,2.45) 16(-4.763,-2.45) 17(-4.127,2.45) 18(-4.128,-2.45) 19(-3.492,2.45) 20(-3.493,-2.45) 21(-2.857,2.45) 22(-2.858,-2.45) 23(-2.222,2.45) 24(-2.223,-2.45) 25(-1.587,2.45) 26(-1.588,-2.45) 27(-0.952,2.45) 28(-0.953,-2.45) 29(-0.317,2.45) 30(-0.318,-2.45) 31(0.318,2.45) 32(0.317,-2.45) 33(0.953,2.45) 34(0.952,-2.45) 35(1.588,2.45) 36(1.587,-2.45) 37(2.223,2.45) 38(2.222,-2.45) 39(2.858,2.45) 40(2.857,-2.45) 41(3.493,2.45) 42(3.492,-2.45) 43(4.128,2.45) 44(4.127,-2.45) 45(4.763,2.45) 46(4.762,-2.45) 47(5.398,2.45) 48(5.397,-2.45) 49(6.033,2.45) 50(6.032,-2.45) 51(6.667,2.45) 52(6.667,-2.45) 53(7.302,2.45) 54(7.302,-2.45) 55(7.938,2.45) 56(7.938,-2.45) 57(8.572,2.45) 58(8.572,-2.45) 59(9.207,2.45) 60(9.207,-2.45)
  rect 2.5x2 smd paste+0 mask+0: MECH1(-12.26,0) MECH2(12.26,0)
  round 0.9 hole 0.9 unplated paste-2539.97 mask+0: ""(-10.46,0)
  round 0.7 hole 0.7 unplated paste-2539.97 mask+0: ""(10.46,0)
  silkscreen extent -13.58,-3.3 13.58,4.82, body extent -12.96,-2.6 12.96,2.6, height 5.3
AMPHENOL_919-383J-51A [mm] "50 Ohm, RF Connector, MCX Right Angle PCB Receptacle Jack"
  round 1.9 hole 1.2: 1(0,0)
  round 2.4 hole 1.7: 2(-2.54,2.54) 2(-2.54,-2.54) 2(2.54,2.54) 2(2.54,-2.54)
  silkscreen extent -3,-3 6.5,3, body extent -3,-3 6.5,3, height 6
APBA3010SURKSGC-F01 [mm]
  rect 1.5x1.5 smd: 1(1.75,0) 3(-1.75,0)
  rect 0.9x0.9 smd: 2(0,-0.65)
  silkscreen extent -2.5,-1.3 0.5,0.5, body extent -1.5,-0.5 1.5,1.5, height 1.02
ARTIQ_Logo [mm]
  silkscreen extent -2.89,-5.65 3.17,3.13
C100 [mm] "1mm Diameter SMD Pad"
  round 1 smd paste-0.5: 1(0,0)
c150h100 [mm] "Plated Through Hole: Hole Dia.=1mm Pad Dia.=1.5mm, IPC-7251 Level C"
  round 1.7 hole 1: 1(0,0)
  silkscreen extent -1.2,-1.2 1.2,1.2
CAPC1005X55N [mm] "Capacitor, Non-Polarized, Chip; 1.00mm L X 0.50mm W X 0.70mm H, IPC Medium Density"
  rect 0.62x0.62 smd: 1(-0.45,0) 2(0.45,0)
  body extent -0.52,-0.27 0.53,0.28, height 0.55
CAPMP3216X180N [mm] "Capacitor, Polarized, Molded  Body 3.2x1.6mm, IPC Medium Density"
  rect 1.8x1.25 smd: 1(-1.3,0) 2(1.3,0)
  silkscreen extent -2.4,-0.7 0,1.25, body extent -1.7,-0.9 1.7,0.9, height 1.6
CAPMP6032X280N [mm] "Capacitor, Polarized, Molded  Body 6.0x3.2mm, IPC Medium Density"
  rect 2.35x2.25 smd: 1(-2.45,0) 2(2.45,0)
  silkscreen extent -3.8,-1.75 3.15,1.9, body extent -3.15,-1.75 3.15,1.75, height 2.8
Delock_65848 [mm] "SMA Connector Delock 65848"
  round 2.1 hole 1.4: 1(0,0)
  round 2.2 hole 1.5: 2(-2.54,-2.54) 2(-2.54,2.54) 2(2.54,-2.54) 2(2.54,2.54)
  silkscreen extent -19.1,-4 3,4, body extent -19,-3.13 3,3.13, height 9.13
FIDUCIAL_TOP_C100-200#1 [mm] "Round Fiducial Target, Top Layer, 1.0mm, Top Solder 2.0mm, Keepout =2.0mm"
  round 1 smd paste-0.51 mask+0.5: FTG2(0,0)
  Top Layer keep-out circle w0.1: c0,0 r1
FIDUCIAL_TOP_C100-200#2 [mm] "Round Fiducial Target, Top Layer, 1.0mm, Top Solder 2.0mm, Keepout =2.0mm"
  round 1 smd paste-0.51 mask+0.5: 1(0,0)
  Top Layer keep-out circle w0.1: c0,0 r1
FIDUCIAL_TOP_S100-200 [mm] "Square Fiducial Target, Top Layer, 1.0mm, Top Solder 2.0mm, Keepout =2.0mm"
  rect 1x1 smd rot 45 paste-0.51 mask+0.5: 1(0,0)
  Top Layer keep-out region: 1.414,0 0,-1.414 -1.414,0 0,1.414
IND_MURATA-PS_8400 [mm] "Miniature Surface Mount Power Inductors, 4.5mm L X 3.3mm W X 2.9mm H, MURATA 8400 Series"
  rect 2x3.5 smd: 1(-1.6,0) 2(1.6,0)
  silkscreen extent -0.3,-1.8 0.3,1.8, body extent -2.4,-1.8 2.4,1.8, height 2.9
LED_AVAGO_HSME-C120#1 [mm] "Green Chip LED, 2-Leads, Body 1.7x1.1mm, Side Emitting Package"
  rect 0.8x0.7 smd: 1(-1,0) 2(1,0)
  rect 0.4x0.4 smd: 3(0,-0.35)
  silkscreen extent -1.12,-0.92 0.42,0.8, body extent -0.85,-0.3 0.85,0.8, height 0.7
LED_AVAGO_HSME-C120#2 [mm] "Green Chip LED, 2-Leads, Body 1.7x1.1mm, Side Emitting Package"
  rect 0.8x0.7 smd: 1(-1,0) 2(1,0)
  rect 0.4x0.4 smd: 3(0,0)
  silkscreen extent -1.12,-0.92 0.42,0.8, body extent -0.85,-0.3 0.85,0.8, height 0.7
PTH_3,2x6 [mm]
  round 6 hole 3.2: 1(0,0)
QR_descr [mm]
  silkscreen extent -4.5,-4.5 4.5,4.5
R1SE-1205_H2-R [mm]
  rect 1.2x1.8 smd: 1(-3.81,-5.1) 2(-1.27,-5.1) 4(3.81,-5.1) 5(3.81,5.1) 8(-3.81,5.1)
  silkscreen extent -6.38,-6.8 6.38,5.35, body extent -6.38,-5.55 6.38,5.55, height 6.95
RESC1005X40N [mm] "Chip Resistor, EIA 0402, Metric 1005, Body 1.0x0.5mm, IPC Medium Density"
  rect 0.58x0.62 smd: 1(-0.47,0) 2(0.47,0)
  body extent -0.52,-0.27 0.53,0.28, height 0.4
RESC3216X65N [mm] "Chip Resistor, EIA 1206, Metric 3216, Body 3.2x1.6mm, IPC Medium Density"
  rect 1.15x1.8 smd: 1(-1.45,0) 2(1.45,0)
  silkscreen extent -0.5,-0.8 0.5,0.8, body extent -1.67,-0.87 1.68,0.88, height 0.65
RESC3225X70N [mm] "Chip Resistor, EIA 1210, Metric 3225, Body 3.2x2.5mm, IPC Medium Density"
  rect 1.15x2.7 smd: 1(-1.5,0) 2(1.5,0)
  silkscreen extent -0.55,-1.25 0.55,1.25, body extent -1.7,-1.35 1.7,1.35, height 0.7
SOIC127P594X363-8N [mm] "SOIC, 1.27mm pitch; 8  pin, 3.91mm W X 4.88mm L, IPC Medium Density"
  rect 1.45x0.65 smd: 1(-2.75,1.905) 2(-2.75,0.635) 3(-2.75,-0.635) 4(-2.75,-1.905) 5(2.75,-1.905) 6(2.75,-0.635) 7(2.75,0.635) 8(2.75,1.905)
  silkscreen extent -3.32,-2.45 1.7,2.87, body extent -3.1,-2.5 3.1,2.5, height 3.63
SOIC127P1030X265-24N [mm] "SOIC 24, Pitch 1.27mm - Body 7.6x15.6mm, IPC Medium Density"
  rect 2x0.6 smd: 1(-4.65,6.985) 2(-4.65,5.715) 3(-4.65,4.445) 4(-4.65,3.175) 5(-4.65,1.905) 6(-4.65,0.635) 7(-4.65,-0.635) 8(-4.65,-1.905) 9(-4.65,-3.175) 10(-4.65,-4.445) 11(-4.65,-5.715) 12(-4.65,-6.985) 13(4.65,-6.985) 14(4.65,-5.715) 15(4.65,-4.445) 16(4.65,-3.175) 17(4.65,-1.905) 18(4.65,-0.635) 19(4.65,0.635) 20(4.65,1.905) 21(4.65,3.175) 22(4.65,4.445) 23(4.65,5.715) 24(4.65,6.985)
  silkscreen extent -4.5,-7.8 3.3,7.9, body extent -5.18,-7.8 5.18,7.8, height 1.68
SOIC127P1720X265-16N [mm] "SOIC, 16-Leads, Body 10,30x14,00mm, Pitch 1,27mm, IPC Medium Density"
  rrect16% 2x0.6 smd: 1(-8.125,4.445) 2(-8.125,3.175) 3(-8.125,1.905) 4(-8.125,0.635) 5(-8.125,-0.635) 6(-8.125,-1.905) 7(-8.125,-3.175) 8(-8.125,-4.445) 9(8.125,-4.445) 10(8.125,-3.175) 11(8.125,-1.905) 12(8.125,-0.635) 13(8.125,0.635) 14(8.125,1.905) 15(8.125,3.175) 16(8.125,4.445)
  silkscreen extent -8.25,-5.2 6.7,5.42, body extent -8.62,-5.2 8.62,5.2, height 2.65
SOT95P237X112-3N [mm] "SOT, 0.95mm, pitch; 3 pin,1.30mm W X 2.92mm L X 1.12mm H body, IPC Medium Density"
  rect 1.05x0.6 smd: 1(-1.15,0.95) 2(-1.15,-0.95) 3(1.15,0)
  silkscreen extent -1.53,-1.45 0.3,1.87, body extent -1.25,-1.5 1.25,1.5, height 1.1
SOT95P240X110-3N [mm] "SOT23 3-Leads, Pitch 0.95mm, Body 1.3x2.9mm, IPC Medium Density"
  rect 1.05x0.65 smd: 1(-1.15,0.95) 2(-1.15,-0.95) 3(1.15,0)
  silkscreen extent -1.53,-1.45 0.3,1.92, body extent -1.25,-1.5 1.25,1.5, height 1.1
SOT190P238X100-4N [mm] "SOT143, 4-Leads, Body 2,90x2,38mm, Pitch 1,90mm, IPC Medium Density"
  rect 0.7x1 smd: 1(-1,0.75)
  rect 0.7x0.6 smd: 2(-1,-0.95) 3(1,-0.95) 4(1,0.95)
  silkscreen extent -1.05,-1.5 0.7,1.6, body extent -0.95,-1.5 0.95,1.5, height 1
SW_OMRON_A6S-2102-H [mm] "Pitch 2.54mm, Body 6.2x6.4mm, 2 Ways SPST Surface-Mounting DIP Switch, OMRON A6S-H"
  rect 1.5x1.1 smd: 1(-4.45,1.27) 2(-4.45,-1.27) 3(4.45,-1.27) 4(4.45,1.27)
  silkscreen extent -3.2,-3.11 3.2,3.11, body extent -4.9,-3.01 4.9,3.01, height 3.97
TOSHIBA_11-4M1S [mm] "SOIC,1.27mm Pitch; 4 pin, TOSHIBA Case (5mm Creepage)"
  rect 1.2x0.8 smd: 1(-3.15,1.27) 3(-3.15,-1.27) 4(3.15,-1.27) 6(3.15,1.27)
  Top Layer keep-out region: -2.3,2.2 2.3,2.2 2.3,-2.2 -2.3,-2.2
  silkscreen extent -3.25,-1.98 2.15,2.4, body extent -3.7,-1.98 3.7,1.97, height 2.3
WPME-FISM_SMT-8_L13.2W11.4H7.25 [mm] "Power Module, SMT, body 13.20x11.40mm"
  rect 1x2.1 smd: 1(-3.81,-5.05) 2(-1.27,-5.05) 4(3.81,-5.05) 5(3.81,5.05) 8(-3.81,5.05)
  silkscreen extent -6.85,-5.33 6.85,4.38, body extent -6.6,-5.7 6.6,5.7, height 7.25